# Altium PCB PCB2.pcbdoc
Units mil, origin at the board's own origin, x right, y up, seen from the top; angles counter-clockwise.
Board outline 2468.5 x 1681.1 mil, 2 copper layers (Top Layer, Bottom Layer), stack 62.2 mil thick; 18 components, 14 nets, 54 pads, 19 vias.
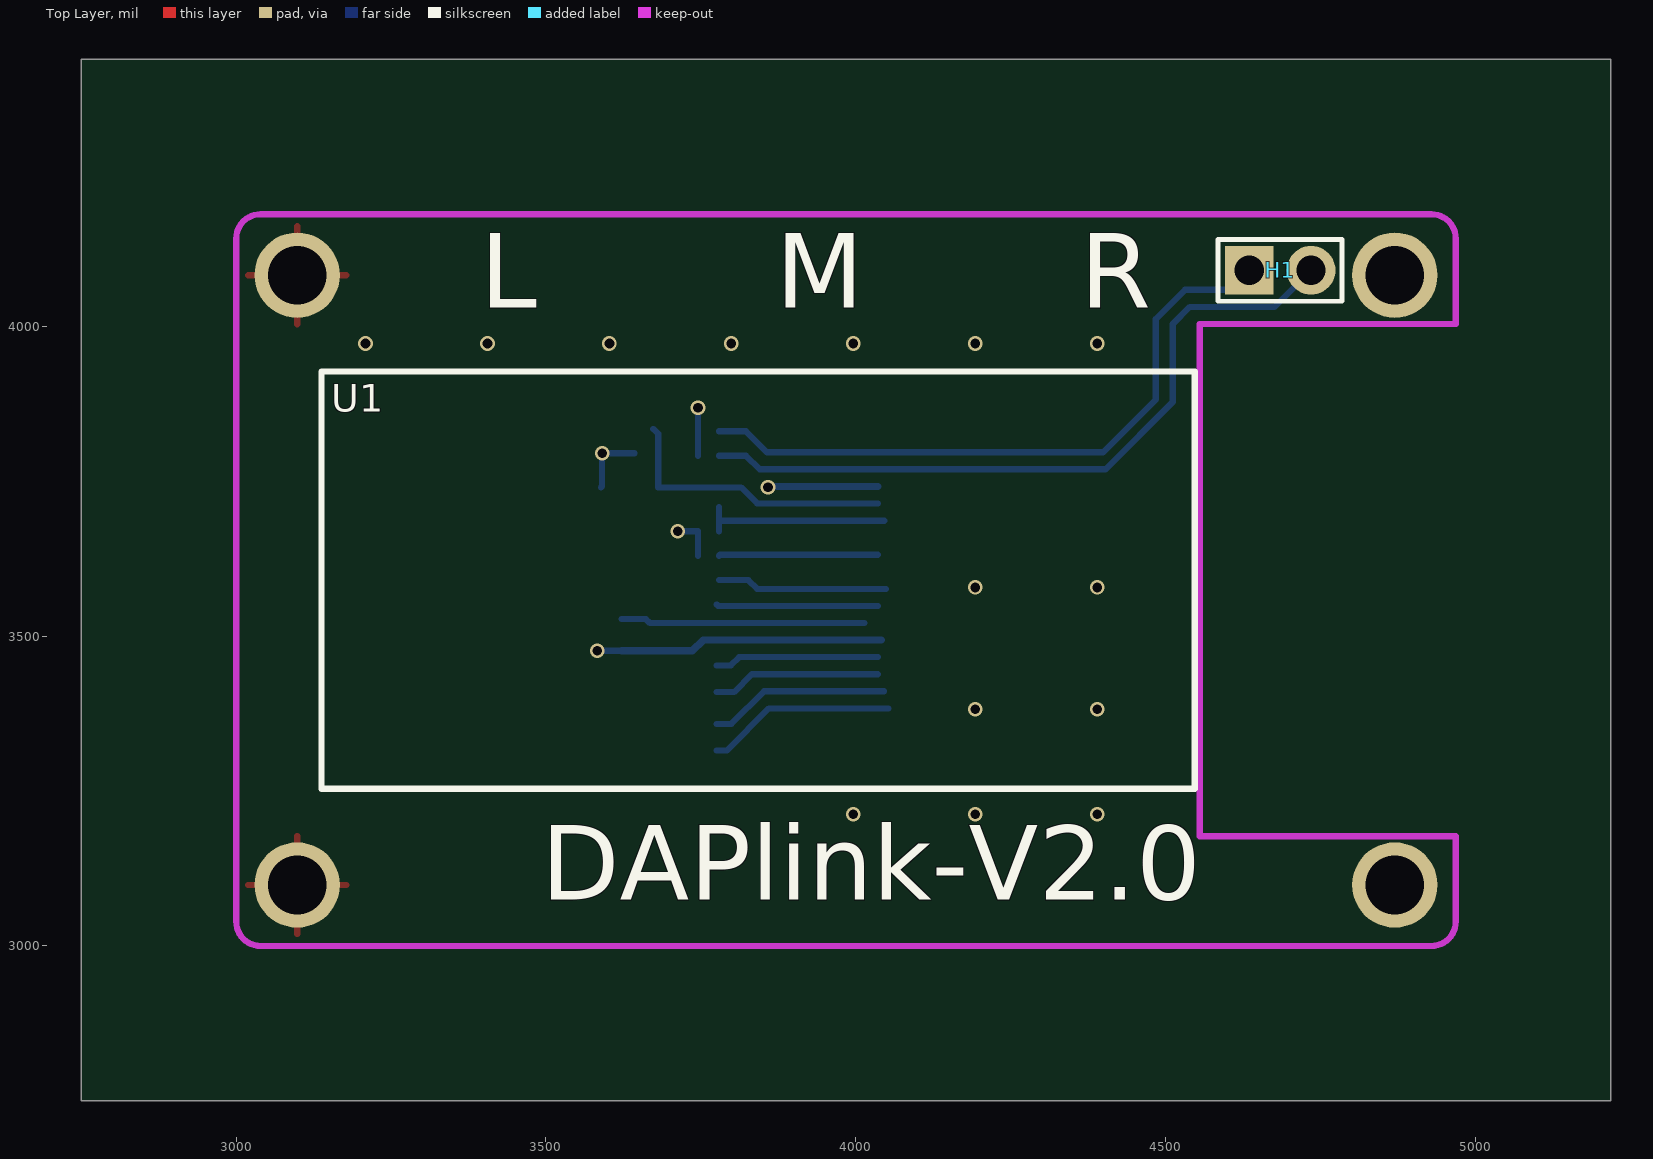
[diagram p0: Top Layer view]
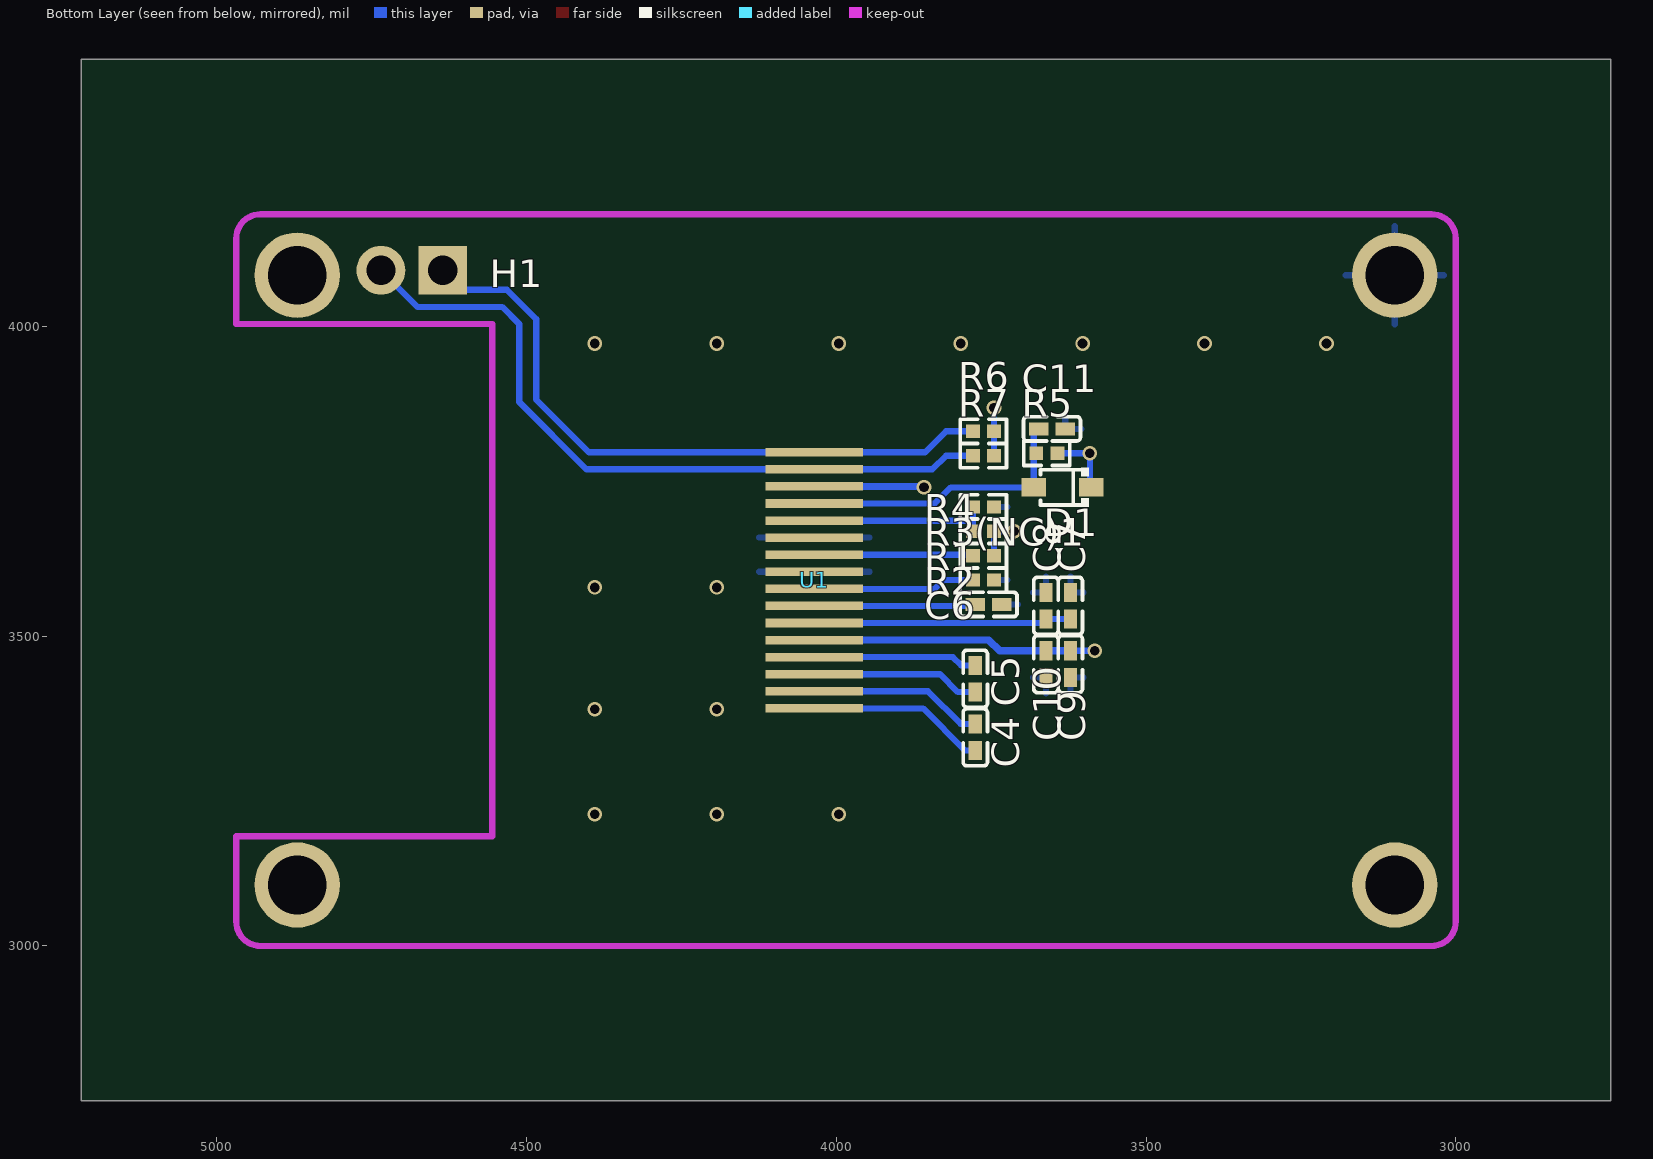
[diagram p1: Bottom Layer view, seen from below]

## Layer stack, top to bottom
Top Solder Mask Layer: solder mask 0.4, Dk 3.3
Top Layer: signal copper 1.4
Dielectric1: surface 59.4, FR4, Dk 4.5
Bottom Layer: signal copper 1.4
Bottom Solder Mask Layer: solder mask 0.4, Dk 3.3

## Board outline
5218.5,2750 2750,2750 2750,4431.1 5218.5,4431.1

## Design rules (kind name [scope] priority, off if disabled: settings)
BoardOutlineClearance copperThickness1oz [All] p0: genericclearance=10 ignorepadtopadclearanceinfootprint=FALSE except(0: Arc-SplitContinuation Track-SplitContinuation SMDPad-SplitContinuation THPad-SplitContinuation Via-SplitContinuation Fill-SplitContinuation Poly-SplitContinuation Region-SplitContinuation Text-SplitContinuation)
BoardOutlineClearance copperThickness2oz [All] p0: genericclearance=10 ignorepadtopadclearanceinfootprint=FALSE except(0: Arc-SplitContinuation Track-SplitContinuation SMDPad-SplitContinuation THPad-SplitContinuation Via-SplitContinuation Fill-SplitContinuation Poly-SplitContinuation Region-SplitContinuation Text-SplitContinuation)
BoardOutlineClearance Plane_innerPlane [All] p0: genericclearance=10 ignorepadtopadclearanceinfootprint=FALSE except(0: Arc-SplitContinuation Track-SplitContinuation SMDPad-SplitContinuation THPad-SplitContinuation Via-SplitContinuation Fill-SplitContinuation Poly-SplitContinuation Region-SplitContinuation Text-SplitContinuation)
BoardOutlineClearance Copper_copperRegion [All] p0: genericclearance=10 ignorepadtopadclearanceinfootprint=FALSE except(0: Arc-SplitContinuation Track-SplitContinuation SMDPad-SplitContinuation THPad-SplitContinuation Via-SplitContinuation Fill-SplitContinuation Poly-SplitContinuation Region-SplitContinuation Text-SplitContinuation)
BoardOutlineClearance otherClearance [All] p0: genericclearance=10 ignorepadtopadclearanceinfootprint=FALSE except(0: Arc-SplitContinuation Track-SplitContinuation SMDPad-SplitContinuation THPad-SplitContinuation Via-SplitContinuation Fill-SplitContinuation Poly-SplitContinuation Region-SplitContinuation Text-SplitContinuation)
Clearance copperThickness1oz [All] p1: gap=7 ignorepadtopadclearanceinfootprint=FALSE
Clearance copperThickness2oz [All] p1: gap=7 ignorepadtopadclearanceinfootprint=FALSE
Clearance Plane_innerPlane [All] p1: gap=7 ignorepadtopadclearanceinfootprint=FALSE
Clearance Copper_copperRegion [All] p1: gap=7 ignorepadtopadclearanceinfootprint=FALSE
Clearance otherClearance [All] p1: gap=7 ignorepadtopadclearanceinfootprint=FALSE
DiffPairsRouting differentialPair [All] p1: maxuncoupledlength=10 minlimit=6 maxlimit=Infinity mostfreqgap=6 toplayer_minwidth=5 toplayer_prefwidth=10 toplayer_maxwidth=100 bottomlayer_minwidth=5 bottomlayer_prefwidth=10 bottomlayer_maxwidth=100
PasteMaskExpansion pasteMaskExpansion [All] p1: expansion=0
PlaneConnect innerPlane [All] p1: planeconnectstyle=Relief reliefexpansion=20 reliefentries=4 reliefconductorwidth=10 reliefairgap=10
PolygonConnect copperRegion [All] p1: connectstyle=Relief reliefentries=4 reliefconductorwidth=10 polygonreliefangle="90 Angle" airgapwidth=10
RoutingVias viaSize [All] p1: viastyle="Through Hole" holewidth=12 minholewidth=11.8 maxholewidth=248 width=12 minwidth=11.8 maxwidth=248
SolderMaskExpansion solderMaskExpansion [IsVia] p1: useseparateexpansions=TRUE expansion=-1000 expansionbottom=-1000
SolderMaskExpansion solderMaskExpansion [All] p2: useseparateexpansions=TRUE expansion=2 expansionbottom=2
Width copperThickness1oz [All] p1: maxlimit=100 minlimit=5 preferedwidth=10
Width copperThickness2oz [All] p1: maxlimit=100 minlimit=8 preferedwidth=10

## Components (designator, comment, footprint, x,y, rotation, side; value= is the part's Value field where it differs from the comment)
C4 "" C0402#1 3775.6,3336.8 r270 bottom
C5 "" C0402#1 3775.6,3431.3 r270 bottom
C6 "" C0402#2 3754.1,3551.2 r0 bottom
C7 "" C0402#3 3622,3549 r270 bottom
C8 "" C0402#3 3661.4,3549 r270 bottom
C9 "" C0402#2 3622,3454.9 r90 bottom
C10 "" C0402#2 3661.4,3454.9 r90 bottom
C11 "" C0402#3 3651.8,3834.6 r0 bottom
D1 "" SOD-323_L1.8-W1.3-LS2.5-RD 3634.9,3740.2 r0 bottom
H1 "PZ254V-11-02P" HDR-TH_2P-P2.54-V-M 4685,4090.6 r0 top
R1 "" R0402#1 3762.5,3629.9 r180 bottom
R2 "" R0402#2 3762.5,3590.6 r0 bottom
R3(NC)1 "" R0402#2 3762.5,3669.3 r0 bottom
R4 "" R0402#2 3762.5,3708.7 r0 bottom
R5 "" R0402#2 3660.1,3795.3 r180 bottom
R6 "" R0402#2 3762.5,3830.7 r0 bottom
R7 "" R0402#2 3762.5,3791.3 r0 bottom
U1 "" OLED 3137.8,3927.2 r0 top

## Footprints (in the part's own frame and the unit in brackets; to place one, negate y for a bottom-side part, rotate by r counter-clockwise, add the part's x,y. Pads: shape width x height; smd on the part's side, far side on the other; paste and mask are expansions set on the pad)
C0402#1 [mil]
  rect 31.1x21.3 smd paste-3937 mask+2: 1(-21.5,0) 2(21.5,0)
  silkscreen extent -46,-20 46,20
C0402#2 [mil]
  rect 31.1x21.3 smd paste-3937 mask+2: 1(-21.4,0) 2(21.5,0)
  silkscreen extent -46,-20 46,20
C0402#3 [mil]
  rect 31.1x21.3 smd paste-3937 mask+2: 1(-21.5,0) 2(21.4,0)
  silkscreen extent -46,-20 46,20
HDR-TH_2P-P2.54-V-M [mil]
  rect 78.7x78.7 hole 47.2 paste+0 mask+2: 1(-50,0)
  round 78.7 hole 47.2 paste+0 mask+2: 2(50,0)
  silkscreen extent -100,-50 100,50
OLED [mil]
  rect 157.5x13.8 smd far side: 1(897.6,-543.7) 2(897.6,-516.2) 3(897.6,-488.6) 4(897.6,-461) 5(897.6,-433.5) 6(897.6,-405.9) 7(897.6,-378.4) 8(897.6,-350.8) 9(897.6,-323.3) 10(897.6,-295.7) 11(897.6,-268.1) 12(897.6,-240.6) 13(897.6,-213) 14(897.6,-185.5) 15(897.6,-157.9) 16(897.6,-130.3)
  silkscreen extent 0,-673 1409,0
R0402#1 [mil]
  rect 22.3x21.3 smd paste-3937 mask+2: 1(-17,0) 2(17.1,0)
  silkscreen extent -37,-20 37,20
R0402#2 [mil]
  rect 22.3x21.3 smd paste-3937 mask+2: 1(-17.1,0) 2(17,0)
  silkscreen extent -37,-20 37,20
SOD-323_L1.8-W1.3-LS2.5-RD [mil]
  rect 39.4x29.5 smd paste+0 mask+2: 1(-46.2,0) 2(46.2,0)
  silkscreen extent -42,-32 36,32

## Free pads (board coordinates)
  round 137.8 hole 94.5: 0(3098.4,3098.4) 0(3098.4,4082.7) 0(4870.1,3098.4) 0(4870.1,4082.7)

## Via types
v1: diameter 23.6, hole 15.7, Top Layer to Bottom Layer, 19 vias

## Nets (pads, with @x,y where several pads share a name; then routed paths per layer and width w, separated by ;. In a path a pad name is that pad's centre, name@x,y a point inside that pad or via, vN(x,y) a via of type N, cw(c..) or ccw(c..) an arc to the next point about the centre after c; other vN are vias at no path point)
3.3V: C9.2 C10.2 D1.1 pad.0@3098.4,3098.4 R1.2 R3(NC)1.1 R5.2 R6.1 R7.1 U1.5 U1.14 | length 903.8
  Bottom Layer w10: v1(3582.7,3476.4) C9.2 ; D1.1 3590.6,3742 v1(3590.6,3795.3) R5.2 ; v1(3712.6,3669.3) 3745.4,3669.3 R1.2 ; v1@3744.1,3870.1 v1(3745.4,3868.7) R6.1 R7.1
  Bottom Layer w11.8: C9.2 C10.2 3736.2,3476.4 3753.6,3493.7 U1.5@4041.7,3493.7 ; v1(3858.3,3740.2) 3859.9,3741.7 U1.14
$1N780: C4.1 U1.2 | length 291.9
  Bottom Layer w10: C4.1 3799.2,3358.3 3852,3411 U1.2@4045.7,3411
$1N781: C5.1 U1.4 | length 265.4
  Bottom Layer w10: C5.1 3798.3,3452.8 3811.7,3466.2 U1.4
$1N782: C4.2 U1.1 | length 305.4
  Bottom Layer w10: C4.2 3791.7,3315.3 3859.9,3383.5 U1.1@4052.8,3383.5
$1N783: C5.2 U1.3 | length 271.7
  Bottom Layer w10: C5.2 3803.5,3409.8 3832.3,3438.6 U1.3
$1N784: R1.1 U1.10 | length 256.6
  Bottom Layer w10: R1.1 3781.1,3631.5 U1.10
$1N787: C6.2 U1.7 | length 260.8
  Bottom Layer w10: C6.2 3777.9,3548.8 U1.7
$1N788: C7.2 C8.2 U1.6 | length 394.8
  Bottom Layer w10: C7.2 C8.2 3667.7,3521.3 U1.6@4014.2,3521.3
$1N789: R2.2 U1.8 | length 275.2
  Bottom Layer w10: R2.2 3826.8,3590.6 3840.9,3576.4 U1.8@4048.8,3576.4
$1N791: R3(NC)1.2 R4.2 U1.12 | length 316.8
  Bottom Layer w10: 3779.5,3669.3 3779.5,3686.4 ; R4.2 3779.5,3686.4 ; 3796.5,3686.2 3807.4,3686.3 ; U1.12@4046,3686.3 3807.4,3686.3 ; 3779.5,3686.4 3779.6,3686.3 3807.4,3686.3
$1N794: C11.2 D1.2 R5.1 U1.13 | length 462.8
  Bottom Layer w10: C11.2 3681.1,3826.8 D1.2 3815,3740.2 3840.9,3714.2 U1.13
GND: C6.1 C7.1 C8.1 C9.1 C10.1 C11.1 pad.0@3098.4,4082.7 R2.1 R4.1 U1.9 U1.11
  other v1: 3996.1,3212.6 4192.9,3212.6 4389.8,3212.6 4192.9,3381.9 4389.8,3381.9 4192.9,3578.7 4389.8,3578.7 3208.7,3972.4 3405.5,3972.4 3602.4,3972.4 3799.2,3972.4 3996.1,3972.4 4192.9,3972.4 4389.8,3972.4
SCL: H1.2 R7.2 U1.15 | length 1171.5
  Bottom Layer w10: R7.2 3822.8,3791.3 3844.9,3769.3 U1.15 4403.2,3769.3 4511.8,3878 4511.8,4003.9 4539.4,4031.5 4676,4031.5 H1.2
SDA: H1.1 R6.2 U1.16 | length 1080.4
  Bottom Layer w10: R6.2 3822.8,3830.7 3856.7,3796.9 U1.16 4399.2,3796.9 4484.3,3881.9 4484.3,4011.8 4531.5,4059.1 4626,4059.1 4635,4068.1 H1.1

## Polygon pours and split planes (outlines as drawn)
3.3V on Top Layer (solid, remove dead copper, pour order 0): 3000,3933.1 3842.5,3933.1 3885.8,3889.8 3885.8,3078.7 3807.1,3000 3000,3000
GND on Top Layer (solid, remove dead copper, pour order 2): 3000,4181.1 3000,3000 4968.5,3000 4968.5,4181.1
GND on Bottom Layer (solid, remove dead copper, pour order 8): 3000,4181.1 3000,3000 4968.4,3000 4968.4,4181.1

## Keep-outs
Board Outline Layer:
  lines w10: 3000,3039.4 3000,4141.7 3000.3,4146.9 3001.3,4151.9 3003,4156.8 3005.3,4161.4 3008.1,4165.7 3011.5,4169.6 3015.4,4173 3019.7,4175.8 3024.3,4178.1 3029.2,4179.8 3034.2,4180.8 3039.4,4181.1 4929.1,4181.1 4934.3,4180.8 4939.3,4179.8 4944.2,4178.1 4948.8,4175.8 4953.1,4173 4957,4169.6 4960.4,4165.7 4963.2,4161.4 4965.5,4156.8 4967.2,4151.9 4968.2,4146.9 4968.5,4141.7 4968.5,4003.9 4555.1,4003.9 4555.1,3177.2 4968.5,3177.2 4968.5,3039.4 4968.2,3034.2 4967.2,3029.2 4965.5,3024.3 4963.2,3019.7 4960.4,3015.4 4957,3011.5 4953.1,3008.1 4948.8,3005.3 4944.2,3003 4939.3,3001.3 4934.3,3000.3 4929.1,3000 3039.4,3000 3034.2,3000.3 3029.2,3001.3 3024.3,3003 3019.7,3005.3 3015.4,3008.1 3011.5,3011.5 3008.1,3015.4 3005.3,3019.7 3003,3024.3 3001.3,3029.2 3000.3,3034.2 3000,3039.4

## Silkscreen, mask and mechanical layers (free items; w line width, h text height)
Top Silkscreen Layer:
  text "L" at 3393.7,4030.2 h120
  text "M" at 3871,4030.2 h120
  text "R" at 4362.2,4030.2 h120
  text "DAPlink-V2.0" at 3492.1,3074.8 h120